# Altium PCB Secondary-Board-v1.0.PcbDoc (part 3 of 3)
Units mm, origin at the board's own origin, x right, y up, seen from the top; angles counter-clockwise.
Board outline 160 x 120 mm, 4 copper layers (Top Layer, GND, PWR, Bottom Layer), stack 1.566 mm thick; 110 components, 60 nets, 340 pads, 181 vias.
Unrouted connection lines stored in the file: 32.
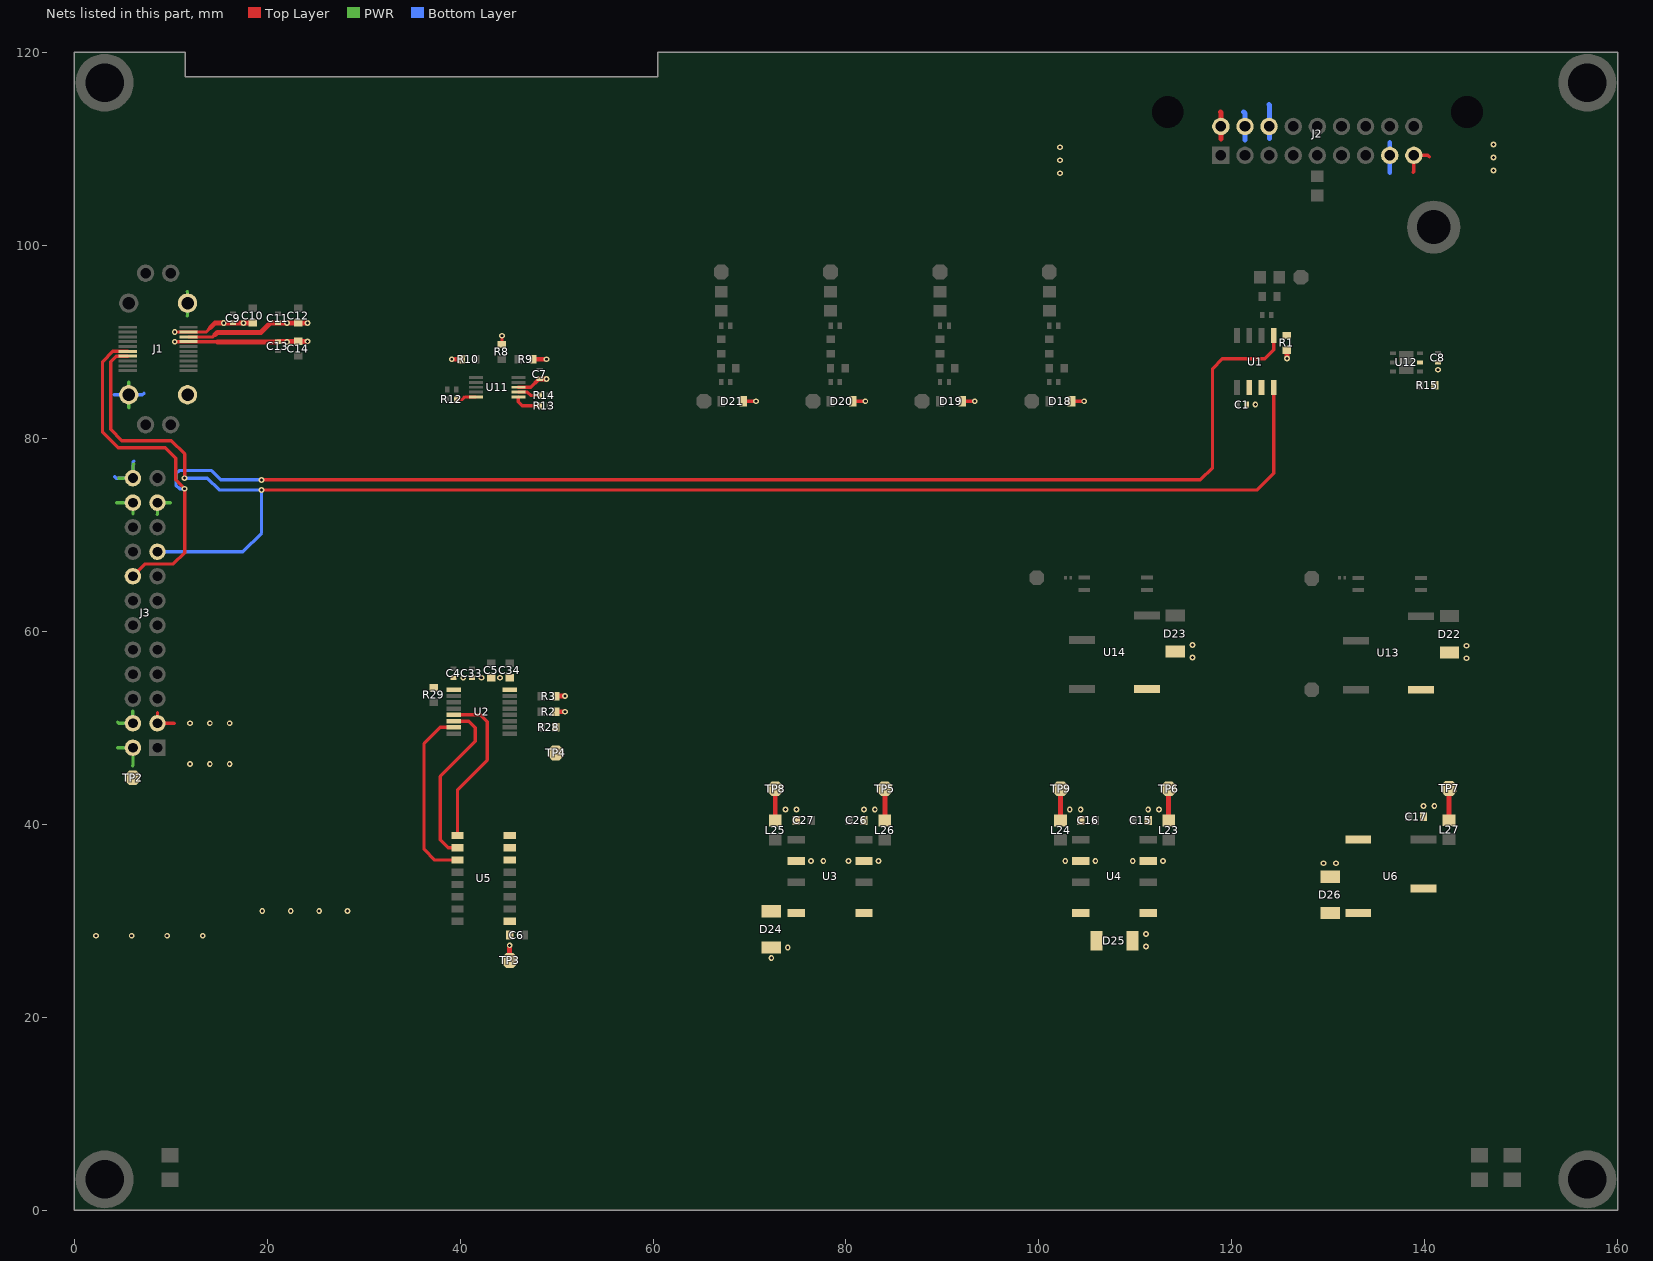
[diagram p4: the nets of this part, all layers, seen from the top]

## Via types
v1: diameter 0.6, hole 0.3, Top Layer to Bottom Layer, 181 vias

## Nets (pads, with @x,y where several pads share a name; then routed paths per layer and width w, separated by ;. In a path a pad name is that pad's centre, name@x,y a point inside that pad or via, vN(x,y) a via of type N, cw(c..) or ccw(c..) an arc to the next point about the centre after c; other vN are vias at no path point) (continued)
NetR12_1: R12.1 U11.5 | length 2.1
  Top Layer w0.33: R12.1@39.611,83.998 40.233,83.998 40.503,84.268 U11.5@41.64,84.268
NetR13_1: R13.1 U11.6 | length 2.9
  Top Layer w0.345: U11.6@46.04,84.243 46.04,83.764 46.442,83.363 R13.1@48.26,83.363 R13.1@48.283,83.363
NetR14_1: R14.1 U11.7 | length 2.4
  Top Layer w0.345: U11.7@46.04,84.768 46.99,84.768 47.34,84.418 R14.1@48.26,84.418
NetU2_5: U2.5 U5.1 | length 16.8
  Top Layer w0.345: U2.5@39.34,51.313 42.103,51.313 42.805,50.612 42.805,46.632 39.743,43.57 U5.1@39.743,38.811
NetU2_6: U2.6 U5.2 | length 17.8
  Top Layer w0.345: U2.6@39.34,50.663 40.902,50.663 41.571,49.994 41.571,48.556 37.948,44.933 37.948,38.367 38.756,37.559 39.726,37.559 U5.2@39.743,37.541
NetU2_7: U2.7 U5.3 | length 18.7
  Top Layer w0.345: U2.7@39.34,50.013 37.936,50.013 36.271,48.348 36.271,37.366 37.366,36.271 U5.3@39.743,36.271
RELAY1_OUT1: C26.1 J2.9 L26.2 TP5.1 | length 6.7
  Top Layer w0.33: 138.786,107.544 138.848,107.606 J2.9@138.848,109.3 140.32,109.3 140.462,109.158
  Top Layer w0.508: L26.2@84.023,40.369 TP5.1@84.023,43.663
  other v1: 81.859,41.504 82.987,41.504 147.117,107.721 147.117,109.068 147.117,110.414
RELAY1_OUT2: C27.1 J2.10 L25.2 TP8.1 | length 6.1
  Top Layer w0.508: L25.2@72.669,40.369 TP8.1@72.669,43.663 ; 118.808,113.8 118.848,113.76 J2.10@118.848,112.3 118.848,111.011
  other v1: 73.731,41.504 74.859,41.504 102.184,107.442 102.184,108.788 102.184,110.134
RELAY2_OUT1: C15.1 J2.11 L23.2 TP6.1 | length 6.3
  Top Layer w0.508: L23.2@113.436,40.369 TP6.1@113.436,43.663
  Bottom Layer w0.508: 121.206,113.792 121.348,113.65 J2.11@121.348,112.3 121.348,110.871
  other v1: 111.318,41.504 112.446,41.504
RELAY2_OUT2: C16.1 J2.12 L24.2 TP9.1 | length 6.8
  Top Layer w0.508: L24.2@102.235,40.369 TP9.1@102.235,43.663
  Bottom Layer w0.508: 123.848,114.554 123.873,114.53 123.873,111.049
  other v1: 103.19,41.504 104.318,41.504
RELAY3_OUT1: C17.1 J2.8 L27.2 TP7.1 | length 6.4
  Top Layer w0.508: L27.2@142.494,40.405 TP7.1@142.494,43.688
  Bottom Layer w0.508: 136.348,107.518 J2.8@136.348,109.3 136.348,110.631
  other v1: 139.844,41.876 140.972,41.876
RELAY_1: D24.2 U3.8 U5.16
RELAY_2: D25.2 U4.8 U5.15
RELAY_3: D26.2 U5.14 U6.8
USB_EN: J1.17 J3.17 U1.4 | length 159.3
  Top Layer w0.345: J1.17@5.562,88.485 4.371,88.485 3.785,87.899 3.785,80.896 4.946,79.735 10.074,79.735 11.455,78.354 v1(11.455,75.844) ; v1(19.431,74.625) 122.606,74.625 124.327,76.346 U1.4@124.327,85.233
  Bottom Layer w0.345: J3.17@8.636,68.224 17.5,68.224 19.431,70.155 v1(19.431,74.625) 15.037,74.625 13.818,75.844 v1(11.455,75.844)
USB_OC: J1.16 J3.16 R1.1 U1.5 | length 165.2
  Top Layer w0.345: J1.16@5.562,88.985 4.011,88.985 2.955,87.929 2.955,80.598 4.571,78.981 9.46,78.981 10.546,77.895 10.546,75.661 v1(11.455,74.752) 11.455,68.129 10.279,66.953 7.365,66.953 J3.16@6.096,65.684 ; v1(19.431,75.667) 116.713,75.667 117.983,76.937 117.983,87.189 119.007,88.213 123.404,88.213 124.327,89.136 U1.5@124.327,90.633
  Bottom Layer w0.345: v1(11.455,74.752) 10.928,74.752 10.562,75.119 10.562,76.296 10.898,76.632 14.249,76.632 15.215,75.667 v1(19.431,75.667)
VDD1: C6.1 C9.2 C10.2 D22.1 D23.1 D24.1 D25.1 D26.1 J1.2 J1.P4 J3.2 J3.24 TP2.1 TP3.1 U3.1 U4.1 U5.9 U6.2 U6.5 U13.5 U14.5 | length 26.1
  Top Layer w0.33: v1(10.439,90.985) J1.2@11.862,90.985 13.675,90.985 14.118,91.428
  Top Layer w0.508: 14.118,91.428 14.621,91.931 v1(15.515,91.931) C9.2@16.408,91.931 ; C9.2@16.472,91.931 C10.2@18.529,91.931 ; TP3.1@45.143,25.857 v1(45.143,27.427)
  PWR w0.33: 4.508,47.904 J3.2@6.096,47.904 6.096,46.055 6.045,46.004 ; 4.597,75.87 4.623,75.844 J3.24@6.096,75.844 6.096,77.216 6.198,77.318 ; 5.664,85.776 5.662,85.774 J1.P4@5.662,84.485 5.662,83.162 5.69,83.134
  Bottom Layer w0.33: 4.166,84.485 J1.P4@5.662,84.485 7.095,84.485 7.26,84.65 ; 4.213,75.989 4.359,75.844 J3.24@6.096,75.844 6.096,77.495 6.198,77.597
  other v1: 72.263,26.111 73.959,27.213 111.1,27.305 2.286,28.423 5.969,28.423 9.652,28.423 13.335,28.423 111.1,28.6 129.489,35.936 130.785,35.936 12.014,46.228 14.072,46.228 16.129,46.228 144.302,57.175 115.905,57.252 144.302,58.471 115.905,58.547 17.572,91.931
VDD2: C1.2 C11.2 C12.2 J1.3 J1.P2 J3.3 J3.22 R1.2 U1.2 U1.3 U3.3 U4.3 | length 19.5
  Top Layer w0.33: J3.3@8.636,50.444 10.364,50.444 10.389,50.419 ; J3.3@8.636,50.444 8.636,51.537 ; J1.3@11.862,90.485 14.39,90.485 14.617,90.712
  Top Layer w0.508: 14.617,90.712 14.848,90.943 19.366,90.943 20.354,91.931 v1(22.077,91.931) C12.2@23.228,91.931 v1(24.185,91.931) ; v1(125.698,88.24) R1.2@125.698,89.109
  PWR w0.33: 4.42,73.304 J3.22@6.096,73.304 6.096,72.128
  other v1: 19.507,30.988 22.454,30.988 25.4,30.988 28.346,30.988 80.263,36.169 83.383,36.169 109.722,36.169 112.842,36.169 12.014,50.444 14.072,50.444 16.129,50.444 122.422,83.47
VDD3: C4.2 C5.2 C7.1 C8.1 C13.2 C14.2 C33.2 C34.2 D18.1 D19.1 D20.1 D21.1 J1.4 J1.P1 J3.4 J3.21 R2.2 R3.2 R8.2 R9.2 R10.2 R15.1 R28.2 R29.2 TP4.1 U2.1 U2.16 U3.6 U4.6 U11.8 U12.5 | length 35.6
  Top Layer w0.305: C13.2@21.12,89.967 C13.2@21.15,89.997 ; C14.2@23.199,89.997 C14.2@23.228,90.026
  Top Layer w0.33: v1(10.439,89.985) J1.4@11.862,89.985 14.825,89.985 14.843,89.967 ; R8.2@44.34,89.695 v1(44.34,90.602) ; D21.1@69.359,83.82 v1(70.663,83.82) ; D20.1@80.698,83.82 v1(82.003,83.82) ; D19.1@92.038,83.82 v1(93.342,83.82) ; D18.1@103.378,83.82 v1(104.682,83.82)
  Top Layer w0.381: U11.8@46.04,85.268 47.337,85.268 48.133,86.064 48.133,86.08 48.171,86.118 C7.1@48.26,86.118
  Top Layer w0.508: 14.843,89.967 C13.2@21.12,89.967 ; C13.2@21.15,89.997 C14.2@23.199,89.997 ; C14.2@23.228,90.026 v1(24.185,90.026) ; v1(39.141,88.171) R10.2@40.114,88.171 ; R9.2@47.564,88.171 v1(48.971,88.171) ; C7.1@48.26,86.118 v1(48.971,86.118) ; R2.2@49.936,51.638 v1(50.876,51.638) ; R3.2@49.936,53.263 v1(50.876,53.263)
  PWR w0.33: 4.508,50.559 4.623,50.444 J3.4@6.096,50.444 6.074,50.466 6.074,51.694 ; 8.619,72.085 8.636,72.103 J3.21@8.636,73.304 9.982,73.304 10.008,73.33 ; 11.709,92.64 11.762,92.692 J1.P1@11.762,93.985 11.762,95.146 11.709,95.199
  other v1: 76.383,36.169 77.648,36.17 102.722,36.169 105.842,36.169 40.335,55.156 42.224,55.156 44.145,55.156 141.351,87.083 22.077,89.967
pads on no net: J1.18 J1.19 J1.20 J2. J2.13 J3.18 J3.19 J3.20 U2.4 U2.9 U2.10 U2.11 U2.12 U3.2 U3.7 U4.2 U4.7 U5.4 U5.5 U5.6 U5.7 U5.10 U5.11 U5.12 U5.13

## Polygon pours and split planes (outlines as drawn)
GND on Bottom Layer "GND_L04_P033" (solid, remove dead copper, pour order 33): 7.239,119.456 7.239,115.316 cw(c4.699,115.316) 4.699,112.776 0.356,112.776 0.356,0.635 159.334,0.635 159.334,112.954 155.296,112.954 cw(c155.118,115.468) 152.603,115.291 152.603,119.456 61.087,119.456 61.087,116.891 11.024,116.891 11.024,119.456
12V_START1 on Bottom Layer "12V_START1_L04_P027" (solid, pour order 27): 4.394,92.735 4.394,89.56 3.353,88.519 3.353,65.608 4.293,64.668 6.883,64.668 7.373,64.179 7.373,62.543 6.711,61.881 0.882,61.881 0.356,62.408 0.356,92.786 4.394,92.786
ISO_RELAY2_IN1 on Bottom Layer "ISO_RELAY2_IN1_L04_P026" (solid, pour order 26): 118.008,47.447 118.745,46.711 130.581,46.711 134.544,50.673 134.544,106.045 133.089,107.5 128.745,107.5 128.023,108.222 128.023,110.051 127.381,110.693 125.765,110.693 125.222,110.15 125.222,105.689 126.746,104.165 131.039,99.873 131.039,53.772 129.21,51.943 118.872,51.943 118.008,51.079
VDD1 on Bottom Layer "VDD1_L04_P021" (solid, pour order 21): 10.126,90.449 9.77,90.094 7.747,90.094 7.493,89.84 7.493,83.525 6.274,82.306 6.274,79.311 7.391,78.193 7.391,74.981 6.756,74.371 4.293,74.371 3.683,74.981 3.683,88.367 4.648,89.332 4.648,92.735 18.11,92.735 18.644,92.202 18.644,89.383 12.141,89.383 11.074,90.449
ISO_RELAY1_IN1 on Bottom Layer "ISO_RELAY1_IN1_L04_P013" (solid, pour order 13): 122.631,100.248 120.523,102.356 120.523,106.068 122.631,108.176 122.631,110.42 122.905,110.693 124.943,110.693 125.222,110.414 125.222,105.027 125.222,104.559 130.327,99.453 130.327,58.471 129.311,57.455 126.543,57.455 125.527,58.471 125.527,97.454
RELAY1_OUT1 on Bottom Layer "RELAY1_OUT1_L04_P010" (solid, pour order 10): 145.085,106.832 145.923,105.994 148.234,105.994 149.098,105.131 149.098,41.25 147.422,39.573 143.408,39.573 85.725,39.573 85.103,40.195 85.103,41.999 84.658,42.443 81.153,42.443 80.645,41.935 80.645,37.516 81.382,36.779 146.609,36.779 151.587,36.779 154.559,39.751 154.559,110.414 153.721,111.252 148.209,111.252 145.821,111.252 145.085,110.515
RELAY1_OUT2 on Bottom Layer "RELAY1_OUT2_L04_P006" (solid, pour order 6): 100.33,57.887 91.961,49.517 79.438,49.517 72.263,42.342 72.263,40.869 72.771,40.361 75.794,40.361 80.727,45.294 96.87,45.283 103.48,51.892 103.48,68.047 103.48,110.846 103.2,111.125 100.66,111.125 100.33,110.795
RELAY2_OUT2 on Bottom Layer "RELAY2_OUT2_L04_P003" (solid, pour order 3): 113.462,118.593 109.83,118.593 105.054,113.817 105.054,47.498 101.092,43.536 101.092,41.25 101.972,40.369 107.832,40.369 108.585,41.123 108.585,111.354 111.785,114.554 121.996,114.554 122.631,113.919 122.631,111.023 122.885,110.769 124.927,110.769 125.222,111.064 125.222,115.519 122.149,118.593
RELAY2_OUT1 on Bottom Layer "RELAY2_OUT1_L04_P002" (solid, pour order 2): 110.109,41.91 110.109,41.021 110.541,40.589 113.386,40.589 113.843,41.046 113.843,106.35 118.008,110.515 122.123,110.515 122.58,110.973 122.58,113.69 122.123,114.148 116.865,114.148 110.109,107.391
RELAY3_OUT1 on Bottom Layer "RELAY3_OUT1_L04_P000" (solid, pour order 0): 142.748,109.83 142.748,107.467 145.085,105.131 147.079,105.131 147.93,104.28 147.93,42.672 145.872,40.615 136.881,40.615 135.932,41.563 135.932,106.029 134.673,107.287 134.673,110.188 135.56,111.074 141.503,111.074
GND on Top Layer "GND_L01_P028" (solid, remove dead copper, pour order 28): 8.13,4.369 ccw(c5.664,4.978) 5.664,7.518 0.356,7.518 0.356,113.03 4.597,113.03 ccw(c4.597,115.57) 7.137,115.57 7.137,119.456 11.024,119.456 11.024,116.891 61.087,116.891 61.087,119.456 152.603,119.456 152.603,115.443 ccw(c155.143,115.443) 155.143,112.903 159.334,112.903 159.334,7.645 154.915,7.645 ccw(c154.915,5.105) 152.375,5.105 152.375,4.369
VDD2 on Top Layer "VDD2_L01_P025" (solid, pour order 25): 7.366,51.867 7.366,49.403 18.745,49.403 18.745,29.464 29.235,29.464 29.235,51.867
ISO_RELAY2_IN1 on Top Layer "ISO_RELAY2_IN1_L01_P024" (solid, pour order 24): 105.791,60.477 105.359,60.909 95.479,60.909 94.183,59.614 94.183,48.819 95.453,47.549 120.65,47.549 121.209,48.108 121.209,50.952 120.65,51.511 97.714,51.511 96.977,52.248 96.977,56.591 97.815,57.429 105.334,57.429 105.791,57.887 105.791,58.344
VDD1 on Top Layer "VDD1_L01_P017" (solid, pour order 17): 16.713,25.552 16.713,47.447 11.405,47.447 11.405,45.923 7.366,45.923 7.366,49.251 4.47,49.251 4.47,74.397 7.493,74.397 7.493,78.105 0.381,78.105 0.381,25.552
12V_START1 on Top Layer "12V_START1_L01_P004" (solid, pour order 4): 1.676,89.357 1.676,88.764 1.803,88.637 2.769,88.637 3.617,89.485 4.262,89.485 4.61,89.833 6.515,89.833 6.515,90.137 4.478,90.137 4.13,90.485 2.959,90.485 2.524,90.92 1.809,90.92 1.676,90.788 1.676,90.373
ISO_RELAY1_IN1 on Top Layer "ISO_RELAY1_IN1_L01_P014" (solid, pour order 14): 134.18,57.582 128.6,57.582 128.27,57.912 128.27,60.147 128.575,60.452 134.18,60.452
RELAY1_OUT1 on Top Layer "RELAY1_OUT1_L01_P007" (solid, pour order 7): 147.117,111.328 147.574,111.328 148.209,110.693 148.209,107.34 147.65,106.782 138.049,106.782 137.465,107.366 137.465,110.769 138.024,111.328
RELAY1_OUT2 on Top Layer "RELAY1_OUT2_L01_P012" (solid, pour order 12): 119.736,114.376 116.535,114.376 113.284,111.125 100.66,111.125 100.051,110.515 100.051,107.188 100.635,106.604 113.944,106.604 117.983,110.642 119.71,110.642 120.32,111.252 120.32,113.792
GND on GND "GND_L02_P032" (solid, pour order 32): 12.04,107.188 12.04,116.891 61.062,116.891 61.087,116.865 61.087,119.38 151.359,119.38 151.359,4.801 4.902,4.801 4.902,107.188
CH_GND on GND "CH_GND_L02_P030" (solid, pour order 30): 4.216,108.331 10.897,108.331 10.897,119.456 0.711,119.456 0.711,1.016 158.909,1.016 159.258,1.365 159.258,119.405 151.841,119.405 151.841,4.623 151.486,4.267 6.316,4.267 4.216,6.367
HV-GND on GND "HV-GND_L02_P011" (solid, pour order 11): 132.715,52.807 134.29,54.381 134.29,106.807 126.289,106.807 125.578,106.096 125.578,93.142 129.681,89.038 129.681,56.678 129.667,56.693 118.415,56.693 117.602,55.88 110.236,55.88 109.271,56.845 100.254,56.845 99.695,56.286 99.695,53.34 100.228,52.807
VDD2 on PWR "VDD2_L03_P029" (solid, pour order 29): 122.428,84.023 122.428,89.687 128.041,89.687 128.041,61.468 114.325,61.468 113.081,60.223 113.081,56.109 114.427,54.762 123.266,54.762 126.898,51.13 126.898,29.464 0.483,29.464 0.483,38.1 74.625,38.1 74.625,34.9 78.994,34.9 78.994,38.1 101.6,38.1 101.6,35.052 107.391,35.052 107.391,84.023
VDD1 on PWR "VDD1_L03_P023" (solid, pour order 23): 3.697,48.59 3.697,44.526 22.86,44.526 22.86,48.59
VDD1 on PWR "VDD1_L03_P022" (solid, pour order 22): 3.861,75.955 4.794,75.021 6.695,75.021 7.264,75.59 7.264,81.998 8.604,83.337 10.146,83.337 10.146,85.231 9.271,86.106 4.599,86.106 3.861,85.367
VDD3 on PWR "VDD3_L03_P020" (solid, pour order 20): 122.123,84.506 122.123,89.941 122.149,89.967 128.295,89.967 128.346,89.967 128.346,84.506 145.694,84.506 145.72,84.531 145.72,95.682 19.568,95.682 18.39,94.503 18.39,90.424 14.605,90.424 14.605,94.855 13.479,95.981 11.221,95.981 10.566,95.326 10.566,92.05 11.176,91.44 11.176,90.424 9.271,90.424 9.271,89.052 19.482,89.052 19.482,92.659 26.06,92.659 26.06,90.576 21.59,90.576 21.59,89.152 25.908,89.152 25.984,89.076 25.984,83.033 8.743,83.033 7.493,81.782 7.493,72.119 8.035,71.577 8.357,71.647 8.636,71.614 8.642,71.603 23.343,71.603 23.343,44.272 3.378,44.272 3.378,48.754 3.697,49.073 7.087,49.073 7.518,49.505 7.518,51.613 7.163,51.968 0.483,51.968 0.483,38.303 74.828,38.303 74.828,35.128 78.791,35.128 78.791,38.303 101.829,38.303 101.829,35.306 107.061,35.306 107.061,84.506 113.208,84.506
VDD1 on PWR "VDD1_L03_P016" (solid, pour order 16): 152.375,0.584 152.375,5.08 cw(c154.915,5.08) 154.915,7.62 159.334,7.62 159.334,112.903 155.448,112.903 cw(c155.448,115.443) 152.908,115.443 152.908,119.38 135.687,119.38 135.687,100.254 7.315,100.254 5.123,98.062 5.123,89.669 5.664,89.129 8.509,89.129 8.992,89.611 8.992,90.526 11.049,90.526 11.049,91.339 10.223,92.165 10.223,95.433 11.113,96.323 13.507,96.323 14.884,94.945 14.884,90.576 18.161,90.576 18.161,94.615 19.456,95.91 145.948,95.91 145.948,84.303 128.346,84.303 128.346,60.96 114.656,60.96 113.665,59.969 113.665,56.413 114.757,55.321 123.419,55.321 127.305,51.435 127.305,29.159 0.457,29.159 0.457,7.518 3.886,7.518 cw(c3.886,3.785) 7.62,3.785 7.62,0.584
VDD2 on PWR "VDD2_L03_P019" (solid, pour order 19): 0.356,73.457 0.356,52.383 7.518,52.383 7.518,49.073 22.86,49.073 22.86,71.247 7.264,71.247 7.264,74.185 6.697,74.752 4.42,74.752 3.581,75.59 3.581,85.471 4.47,86.36 9.5,86.36 10.439,85.421 10.439,83.946 11.048,83.337 25.629,83.337 25.629,88.816 21.26,88.816 21.26,90.78 25.857,90.78 25.857,92.456 19.71,92.456 19.71,88.816 0.727,88.816 0.356,88.463
12V_START1 on PWR "12V_START1_L03_P015" (solid, pour order 15): 6.883,116.891 6.883,115.773 cw(c4.072,115.578) 4.267,112.767 0.356,112.767 0.356,89.408 0.635,89.129 4.267,89.129 4.775,89.637 4.775,98.247 7.061,100.533 135.052,100.533 135.052,119.456 61.087,119.456 61.087,116.891

## Keep-outs
Keep-Out Layer:
  circle w0.127: c140.91,101.86 r3.275

## Other copper
Top Layer:
  rectangle net VDD3: 20.777,89.573 24.536,90.484
  rectangle net GND: 136.374,86.633 138.824,88.033
  rectangle net VDD3: 101.437,35.331 106.751,36.957
  rectangle net VDD2: 108.885,35.331 113.863,36.957
  rectangle net VDD2: 79.426,35.331 84.785,36.957
  rectangle net VDD3: 73.914,35.331 78.08,36.957
  rectangle net RELAY_3: 129.175,30.16 134.541,31.41
  rectangle net CH_GND: 0.94,0.635 159.334,3.886
  rectangle net GND: 10.91,91.288 12.815,91.637
  rectangle net +5V-USB: 120.523,98.679 125.508,99.924
  rectangle net +5V-USB: 120.523,98.679 122.174,110.125
  rectangle net +5V-USB: 124.308,96.018 125.508,99.924
  rectangle net VDD1: 138.26,53.524 144.848,55.169
  rectangle net VDD1: 109.871,53.6 116.459,55.88
  rectangle net VDD1: 128.524,32.925 141.174,35.128
  rectangle net VDD1: 134.434,32.925 136.474,38.805
  rectangle net VDD1: 128.524,33.843 136.474,38.805
  rectangle net VDD1: 80.239,25.654 82.759,31.169
  rectangle net HV-GND: 129.412,53.454 134.18,55.829
  rectangle net HV-GND: 100.736,53.556 105.791,55.931
  rectangle net VDD1: 141.545,53.524 144.882,58.953
  rectangle net VDD1: 113.122,53.6 116.459,59.03
  rectangle net RELAY_3: 129.175,20.396 131.175,31.41
  region net VDD1: 131.734,38.805 128.524,38.805 128.524,33.843 131.734,33.843
  rectangle net VDD1: 71.263,25.654 82.759,27.838
  rectangle net RELAY_2: 57.531,23.038 58.903,38.024
  rectangle net RELAY_3: 48.412,20.396 49.784,36.754
  rectangle net RELAY_3: 48.412,20.396 131.175,21.768
  rectangle net RELAY_2: 103.327,30.27 106.573,31.267
  rectangle net RELAY_2: 105.323,23.038 106.573,31.169
  rectangle net RELAY_2: 57.531,23.038 106.573,24.409
  rectangle net RELAY_3: 44.399,35.789 49.784,36.754
  rectangle net RELAY_2: 44.399,37.059 58.903,38.024
  rectangle net RELAY_1: 65.761,30.277 75.87,31.648
  rectangle net RELAY_1: 65.761,30.277 67.132,39.294
  rectangle net RELAY_1: 44.399,38.329 67.132,39.294
  rectangle net NetR13_1: 45.315,84.039 46.765,84.418
  rectangle net NetJ2_5: 128.188,106.537 129.508,110.125
  rectangle net HV-GND: 127.173,104.419 130.523,105.842
  rectangle net HV-GND: 130.175,53.48 134.18,54.369
  rectangle net USB_OC: 124.027,89.858 126.143,91.408
  rectangle net VDD2: 121.304,83.152 123.357,86.008
  rectangle net NetC2_2: 120.217,89.858 123.508,97.338
  rectangle net HV-GND: 101.803,53.556 105.791,54.445
  rectangle net VDD3: 140.617,85.027 141.669,88.062
  rectangle net VDD3: 139.174,87.605 141.669,88.062
  rectangle net I2C_THS_INT: 139.093,85.027 139.855,87.083
  rectangle net RELAY3_OUT1: 139.352,39.7 143.256,42.545
  rectangle net NetL27_1: 138.405,37.694 143.256,39.116
  rectangle net RELAY1_OUT1: 81.331,39.465 84.785,42.037
  region net RELAY1_OUT2: 75.362,42.037 71.907,42.037 71.907,39.465 75.362,39.465
  region net NetL25_1: 75.865,39.065 71.907,39.065 71.907,37.465 75.865,37.465
  rectangle net NetL26_1: 80.853,37.465 84.785,39.065
  rectangle net RELAY2_OUT1: 110.744,39.465 114.198,42.037
  region net RELAY2_OUT2: 104.927,42.037 101.473,42.037 101.473,39.465 104.927,39.465
  region net NetL24_1: 105.323,39.065 101.437,39.065 101.437,37.465 105.323,37.465
  rectangle net NetL23_1: 110.312,37.465 114.198,39.065
  rectangle net VDD1: 109.073,26.915 112.218,31.169
  rectangle net VDD1: 109.073,29.769 112.218,31.169
  rectangle net VDD3: 36.842,53.756 37.731,55.537
  region net VDD1: 45.778,27.046 45.778,30.301 44.508,30.301 44.508,27.046
  rectangle net VDD3: 36.842,53.688 40.09,55.537
  rectangle net VDD3: 44.39,53.688 45.89,55.537
  rectangle net VDD3: 36.842,54.775 50.444,55.537
  rectangle net VDD3: 49.555,46.609 50.444,55.537
  pour cut-out: 137.592,70.128 137.592,90.326 133.35,90.326 133.35,70.128
  pour cut-out: 18.466,76.556 137.592,76.556 137.592,70.128 18.466,70.128
GND:
  rectangle net CH_GND: 151.994,112.217 159.233,119.405
  rectangle net CH_GND: 153.467,1.016 159.258,9.881
  rectangle net CH_GND: 149.352,1.016 159.258,4.267
  rectangle net CH_GND: 0.711,1.016 7.264,4.267
  rectangle net CH_GND: 0.711,0.94 4.216,8.204
  rectangle net CH_GND: 0.711,112.878 7.264,119.431
Bottom Layer:
  pour cut-out: 52.15,67.7 52.15,65.184 54.42,65.184 54.42,67.7
  pour cut-out: 37.541,56.647 37.541,52.878 35.568,52.878 35.568,56.647

## Silkscreen, mask and mechanical layers (free items; w line width, h text height)
Top Overlay:
  lines w0.127: 49.517,84.418 50.884,84.418 ; 68.894,87.807 68.894,88.367 ; 76.866,40.903 76.866,42.71 ; 79.852,40.903 79.852,42.71 ; 80.222,87.796 80.222,88.443 ; 91.525,87.801 91.525,88.341 ; 102.797,87.778 102.797,88.192 ; 106.324,40.903 106.324,42.71 ; 109.311,40.903 109.311,42.71 ; 50.884,84.418 50.648,84.181 50.648,84.418 50.648,84.654 50.884,84.418 ; 76.866,42.71 77.102,42.474 76.866,42.474 76.629,42.474 76.866,42.71 ; 79.852,42.71 80.089,42.474 79.852,42.474 79.616,42.474 79.852,42.71 ; 106.324,42.71 106.088,42.474 106.324,42.474 106.561,42.474 106.324,42.71 ; 109.311,42.71 109.075,42.474 109.311,42.474 109.548,42.474 109.311,42.71
  text "+5V USB" at 128.334,96.193 h1.5
  text "HV-GND" at 122.993,53.54 h1.2
  text "VDD3" at 51.147,46.898 h1.5
  text "VDD1" at 7.285,44.324 h1.5
  text "RELAY3 OUT 1" at 143.648,43.329 h1.2
  text "RELAY2 OUT 2" at 93.525,43.304 h1.2
  text "RELAY2 OUT 1" at 114.616,43.304 h1.2
  text "RELAY1 OUT 2" at 63.909,43.279 h1.2
  text "RELAY1 OUT 1" at 85.178,43.279 h1.2
  text "VDD1" at 46.305,25.471 h1.2
Bottom Overlay:
  drawing of 24 lines, arcs and shapes, not listed
  text "Rev-v1.0" at 89.672,116.048 h2.5
Board Outline:
  the board outline again, w0.203
Fabrication:
  drawing of 295 lines, arcs and shapes, not listed
  text "Layer" at 188.553,127.457 h1.52
  text "Name" at 198.965,127.457 h1.52
  text "Material" at 222.58,127.457 h1.52
  text "Thickness" at 244.418,127.457 h1.52
  text "Constant" at 260.924,127.457 h1.52
  text "Board Layer Stack" at 275.399,127.457 h1.52
  text "Top Overlay" at 198.965,124.409 h1.52
  text "Top Solder" at 198.965,121.361 h1.52
  text "Solder Resist" at 222.58,121.361 h1.52
  text "0.80mil" at 244.418,121.361 h1.52
  text "3.5" at 260.924,121.361 h1.52
  text "1" at 188.553,118.313 h1.52
  text "Top Layer" at 198.965,118.313 h1.52
  text "1.38mil" at 244.418,118.313 h1.52
  text "Dielectric 2" at 198.965,115.265 h1.52
  text "PP-022" at 222.58,115.265 h1.52
  text "7.99mil" at 244.418,115.265 h1.52
  text "4.4" at 260.924,115.265 h1.52
  text "2" at 188.553,112.217 h1.52
  text "GND" at 198.965,112.217 h1.52
  text "CF-004" at 222.58,112.217 h1.52
  text "1.18mil" at 244.418,112.217 h1.52
  text "Dielectric 1" at 198.965,109.169 h1.52
  text "FR-4" at 222.58,109.169 h1.52
  text "40.55mil" at 244.418,109.169 h1.52
  text "4.6" at 260.924,109.169 h1.52
  text "3" at 188.553,106.121 h1.52
  text "PWR" at 198.965,106.121 h1.52
  text "CF-004" at 222.58,106.121 h1.52
  text "1.18mil" at 244.418,106.121 h1.52
  text "Dielectric 3" at 198.965,103.073 h1.52
  text "PP-022" at 222.58,103.073 h1.52
  text "7.99mil" at 244.418,103.073 h1.52
  text "4.4" at 260.924,103.073 h1.52
  text "4" at 188.553,100.025 h1.52
  text "Bottom Layer" at 198.965,100.025 h1.52
  text "1.38mil" at 244.418,100.025 h1.52
  text "Bottom Solder" at 198.965,96.977 h1.52
  text "Solder Resist" at 222.58,96.977 h1.52
  text "0.80mil" at 244.418,96.977 h1.52
  text "3.5" at 260.924,96.977 h1.52
  text "Bottom Overlay" at 198.965,93.929 h1.52
  text "Total board thickness:" at 188.553,90.881 h1.52
  text "63.25mil" at 244.418,90.881 h1.52
Drill Drawing:
  circle w0.254: c1.438,177.389 r0.847
  lines w0.254: 0.592,161.726 1.015,161.726 1.015,161.303 1.862,161.303 1.862,161.726 2.285,161.726 2.285,162.573 1.862,162.573 1.862,162.996 1.015,162.996 1.015,162.573 0.592,162.573 0.592,161.726 ; 0.592,165.959 1.438,165.113 2.285,165.959 1.438,166.806 0.592,165.959 ; 0.592,168.923 2.285,168.923 2.285,170.616 0.592,170.616 0.592,168.923 ; 0.592,174.426 2.285,174.426 1.438,172.733 0.592,174.426 ; 0.592,180.776 1.015,180.776 1.438,180.353 1.862,180.776 2.285,180.776 1.862,181.199 2.285,181.623 1.862,181.623 1.438,182.046 1.015,181.623 0.592,181.623 1.015,181.199 0.592,180.776 ; 0.592,184.163 0.592,184.586 1.015,185.009 0.592,185.433 0.592,185.856 1.015,185.856 1.438,185.433 1.862,185.856 2.285,185.856 2.285,185.433 1.862,185.009 2.285,184.586 2.285,184.163 1.862,184.163 1.438,184.586 1.015,184.163 0.592,184.163 ; 0.592,187.973 1.438,188.396 2.285,187.973 1.862,188.819 2.285,189.666 1.438,189.243 0.592,189.666 1.015,188.819 0.592,187.973
  lines w0.381: -0.927,160.16 178.653,160.16 ; -0.927,190.64 178.653,190.64 ; 13.065,156.35 13.065,194.45 ; 28.301,156.35 28.301,194.45 ; 57.503,156.35 57.503,194.45 ; 70.352,156.35 70.352,194.45 ; 88.99,156.35 88.99,194.45 ; 127.079,156.35 127.079,194.45 ; 142.061,156.35 142.061,194.45 ; 161.004,156.35 161.004,194.45 ; -0.927,156.35 178.653,156.35 178.653,194.45 -0.927,194.45 -0.927,156.35
  text "Symbol" at 1.359,191.783 h1.83
  text "Count" at 14.208,191.783 h1.83
  text "Hole Size" at 29.444,191.783 h1.83
  text "Plated" at 58.646,191.783 h1.83
  text "Hole Type" at 71.495,191.783 h1.83
  text "Drill Layer Pair" at 90.133,191.783 h1.83
  text "Via/Pad" at 128.222,191.783 h1.83
  text "Pad Shape" at 143.204,191.783 h1.83
  text "Template" at 162.147,191.783 h1.83
  text "181" at 14.208,187.973 h1.52
  text "11.81mil (0.300mm)" at 29.444,187.973 h1.52
  text "PTH" at 58.646,187.973 h1.52
  text "Round" at 71.495,187.973 h1.52
  text "Top Layer - Bottom Layer" at 90.133,187.973 h1.52
  text "Via" at 128.222,187.973 h1.52
  text "Rounded" at 143.204,187.973 h1.52
  text "v60h30" at 162.147,187.973 h1.52
  text "24" at 14.208,184.163 h1.52
  text "40.16mil (1.020mm)" at 29.444,184.163 h1.52
  text "PTH" at 58.646,184.163 h1.52
  text "Round" at 71.495,184.163 h1.52
  text "Top Layer - Bottom Layer" at 90.133,184.163 h1.52
  text "Pad" at 128.222,184.163 h1.52
  text "(Mixed)" at 143.204,184.163 h1.52
  text "(Mixed)" at 162.147,184.163 h1.52
  text "4" at 14.208,180.353 h1.52
  text "43.00mil (1.092mm)" at 29.444,180.353 h1.52
  text "PTH" at 58.646,180.353 h1.52
  text "Round" at 71.495,180.353 h1.52
  text "Top Layer - Bottom Layer" at 90.133,180.353 h1.52
  text "Pad" at 128.222,180.353 h1.52
  text "Rounded" at 143.204,180.353 h1.52
  text "c180h109" at 162.147,180.353 h1.52
  text "18" at 14.208,176.543 h1.52
  text "43.31mil (1.100mm)" at 29.444,176.543 h1.52
  text "PTH" at 58.646,176.543 h1.52
  text "Round" at 71.495,176.543 h1.52
  text "Top Layer - Bottom Layer" at 90.133,176.543 h1.52
  text "Pad" at 128.222,176.543 h1.52
  text "(Mixed)" at 143.204,176.543 h1.52
  text "(Mixed)" at 162.147,176.543 h1.52
  text "4" at 14.208,172.733 h1.52
  text "51.00mil (1.295mm)" at 29.444,172.733 h1.52
  text "PTH" at 58.646,172.733 h1.52
  text "Round" at 71.495,172.733 h1.52
  text "Top Layer - Bottom Layer" at 90.133,172.733 h1.52
  text "Pad" at 128.222,172.733 h1.52
  text "Rounded" at 143.204,172.733 h1.52
  text "c200h130" at 162.147,172.733 h1.52
  text "2" at 14.208,168.923 h1.52
  text "129.92mil (3.300mm)" at 29.444,168.923 h1.52
  text "NPTH" at 58.646,168.923 h1.52
  text "Round" at 71.495,168.923 h1.52
  text "Top Layer - Bottom Layer" at 90.133,168.923 h1.52
  text "Pad" at 128.222,168.923 h1.52
  text "Rounded" at 143.204,168.923 h1.52
  text "c0hn330" at 162.147,168.923 h1.52
  text "1" at 14.208,165.113 h1.52
  text "137.79mil (3.500mm)" at 29.444,165.113 h1.52
  text "PTH" at 58.646,165.113 h1.52
  text "Round" at 71.495,165.113 h1.52
  text "Top Layer - Bottom Layer" at 90.133,165.113 h1.52
  text "Pad" at 128.222,165.113 h1.52
  text "Rounded" at 143.204,165.113 h1.52
  text "c550h350" at 162.147,165.113 h1.52
  text "4" at 14.208,161.303 h1.52
  text "157.48mil (4.000mm)" at 29.444,161.303 h1.52
  text "PTH" at 58.646,161.303 h1.52
  text "Round" at 71.495,161.303 h1.52
  text "Top Layer - Bottom Layer" at 90.133,161.303 h1.52
  text "Pad" at 128.222,161.303 h1.52
  text "Rounded" at 143.204,161.303 h1.52
  text "c600h400" at 162.147,161.303 h1.52
  text "238 Total" at 14.208,157.493 h1.52

## Dimensions
0,120 to 160,120 on Board Outline
160,120 to 160,0 on Board Outline

## Text inside footprints (layer, text, board x,y; h text height)
J1: Top Overlay "20" at 5.87,86.617 h0.5 r270; Top Overlay "1" at 10.975,92.103 h0.5 r270
J2: Top Overlay "18" at 141.517,112.809 h1 r180; Top Overlay "1" at 117.514,109.736 h1 r180; Top Overlay "PCB Edge" at 112.497,117.297 h1.27